# Altium PCB Briac_Charger.PcbDoc (part 1 of 4)
Units mm, origin at the board's own origin, x right, y up, seen from the top; angles counter-clockwise.
Board outline 70.05 x 79.98 mm, 2 copper layers (Top Layer, Bottom Layer), stack 1.448 mm thick; 114 components, 62 nets, 335 pads, 3733 vias.
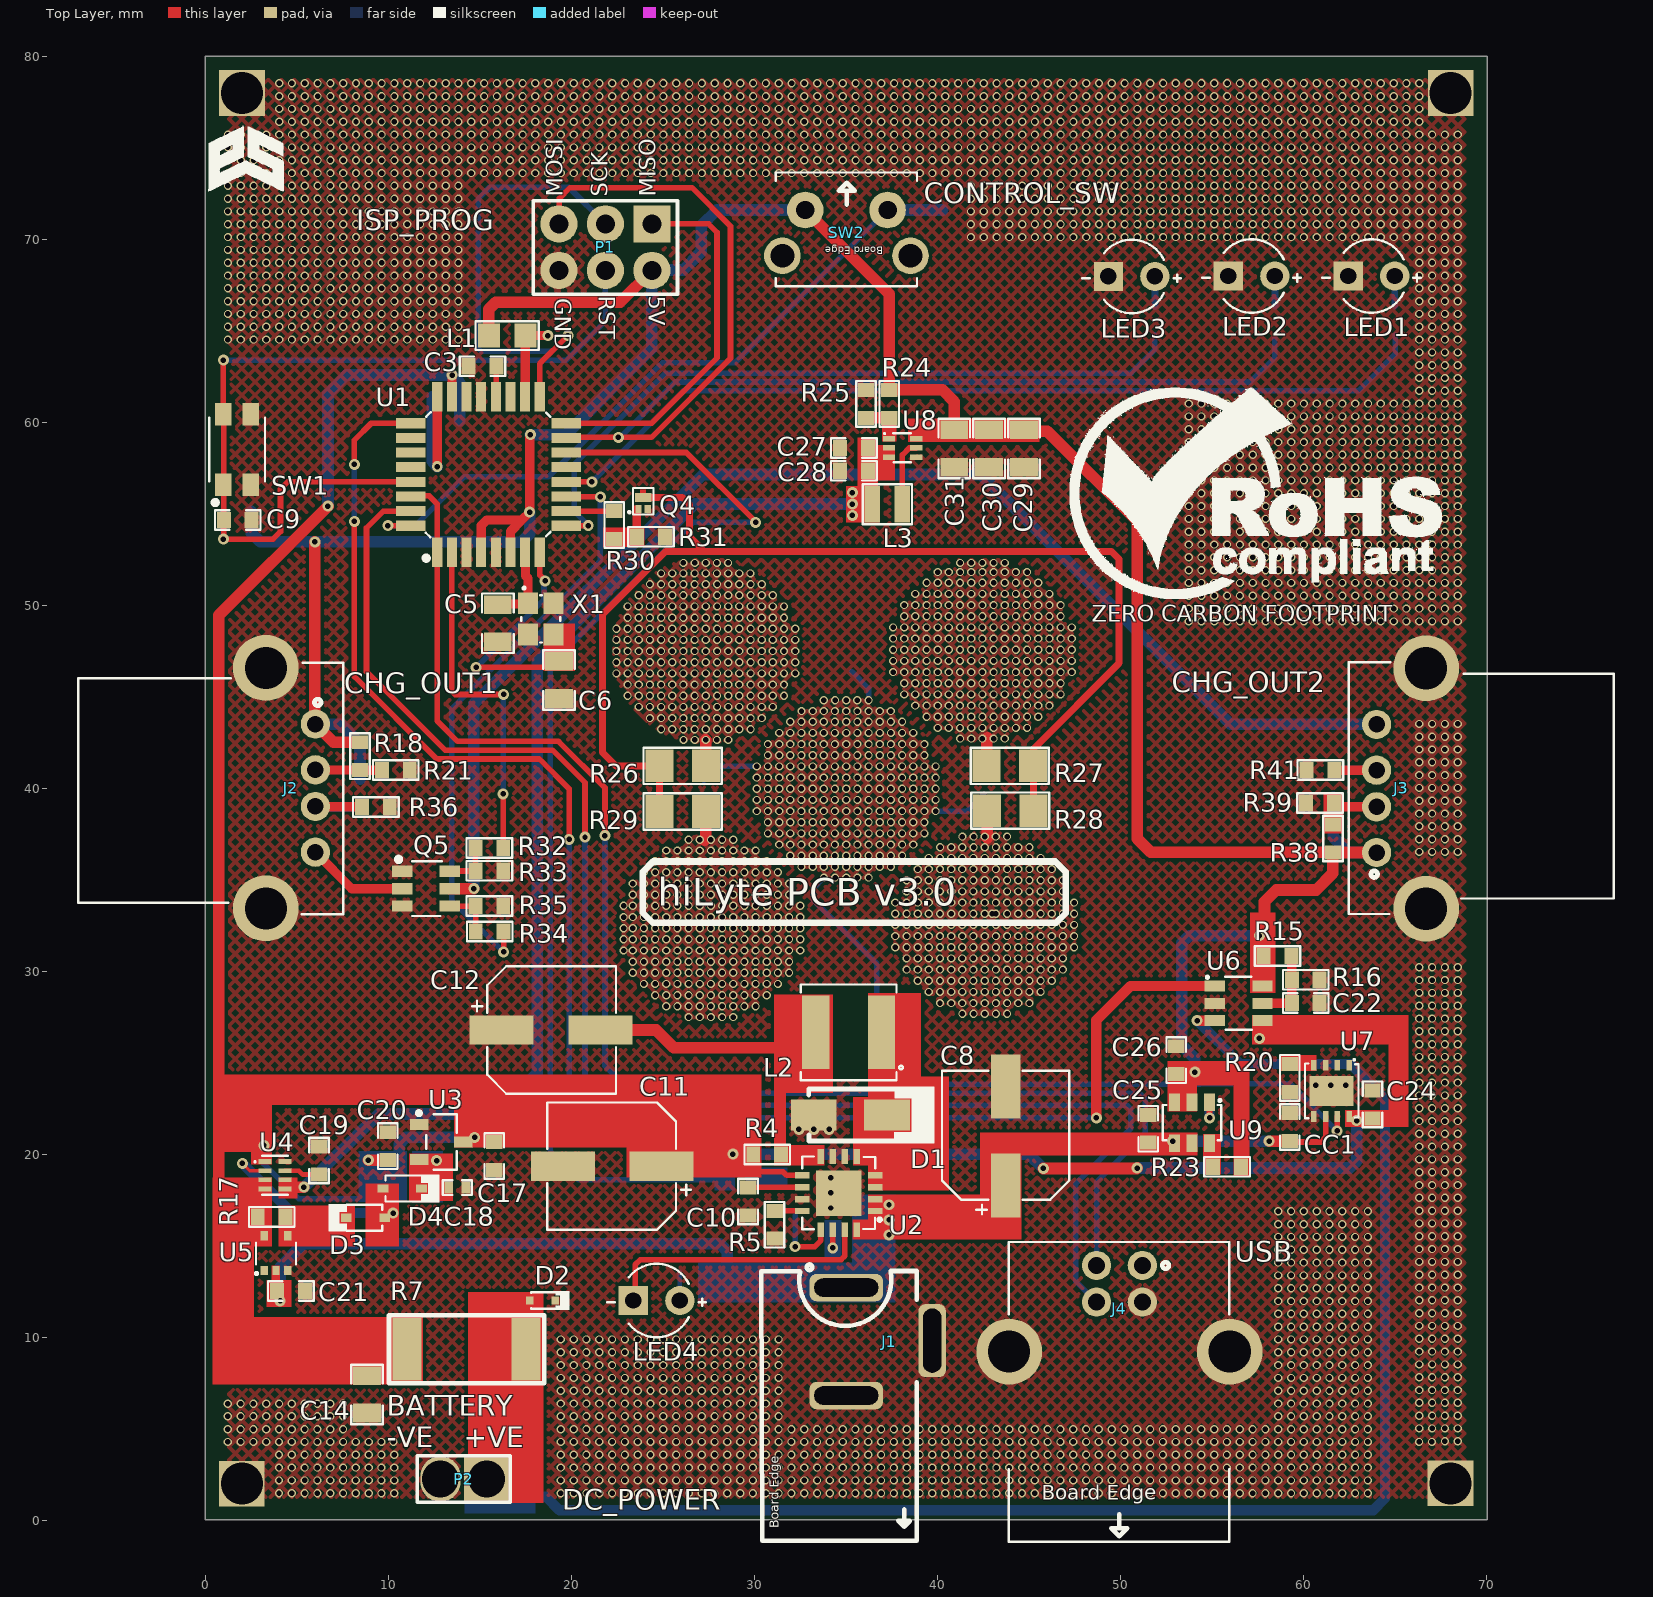
[diagram p0: Top Layer view]
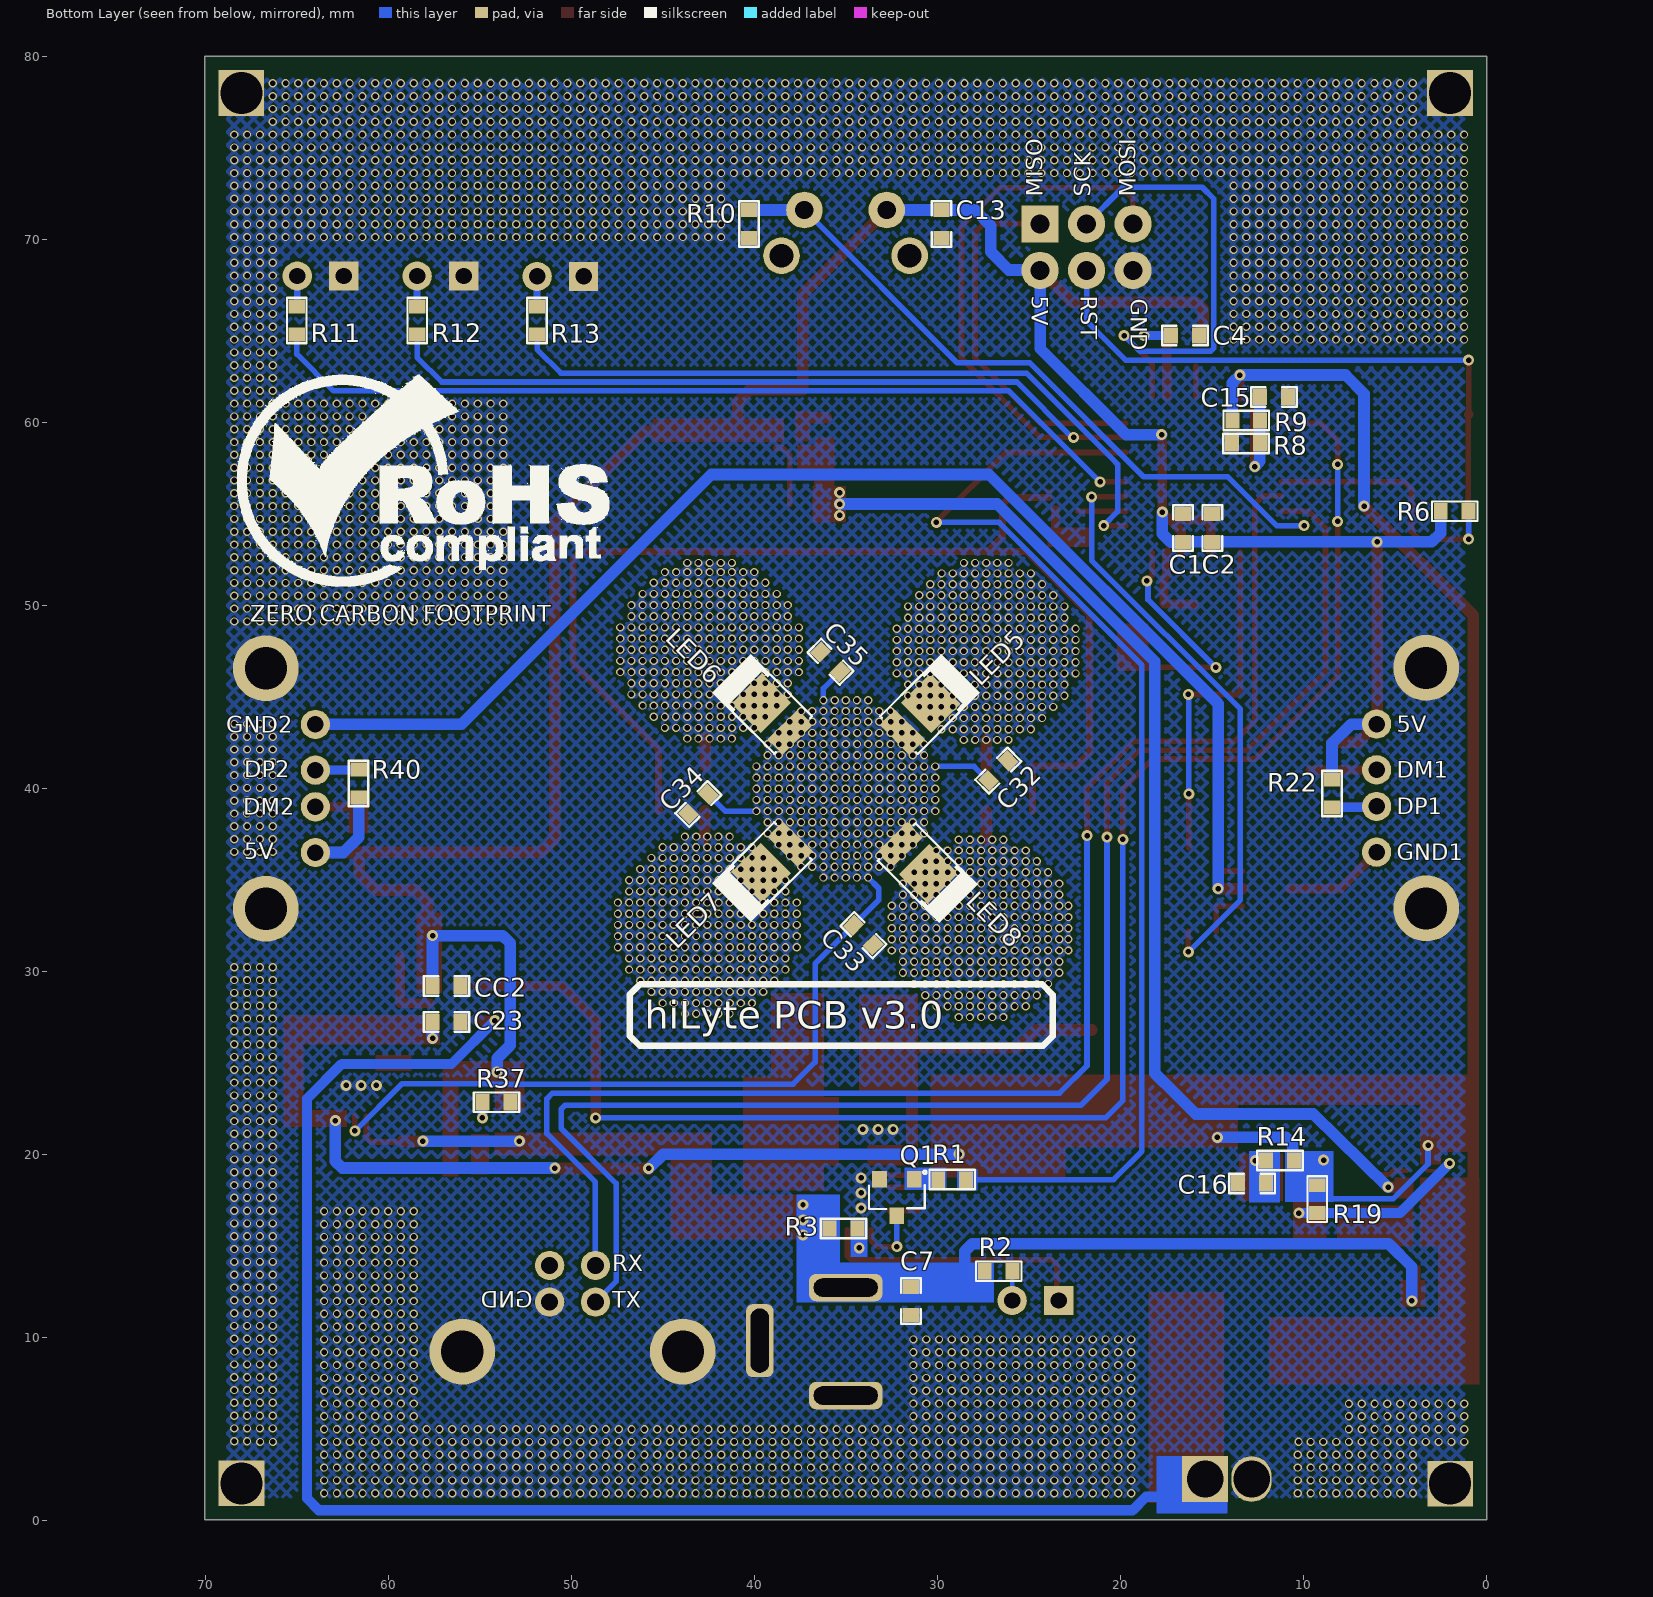
[diagram p1: Bottom Layer view, seen from below]
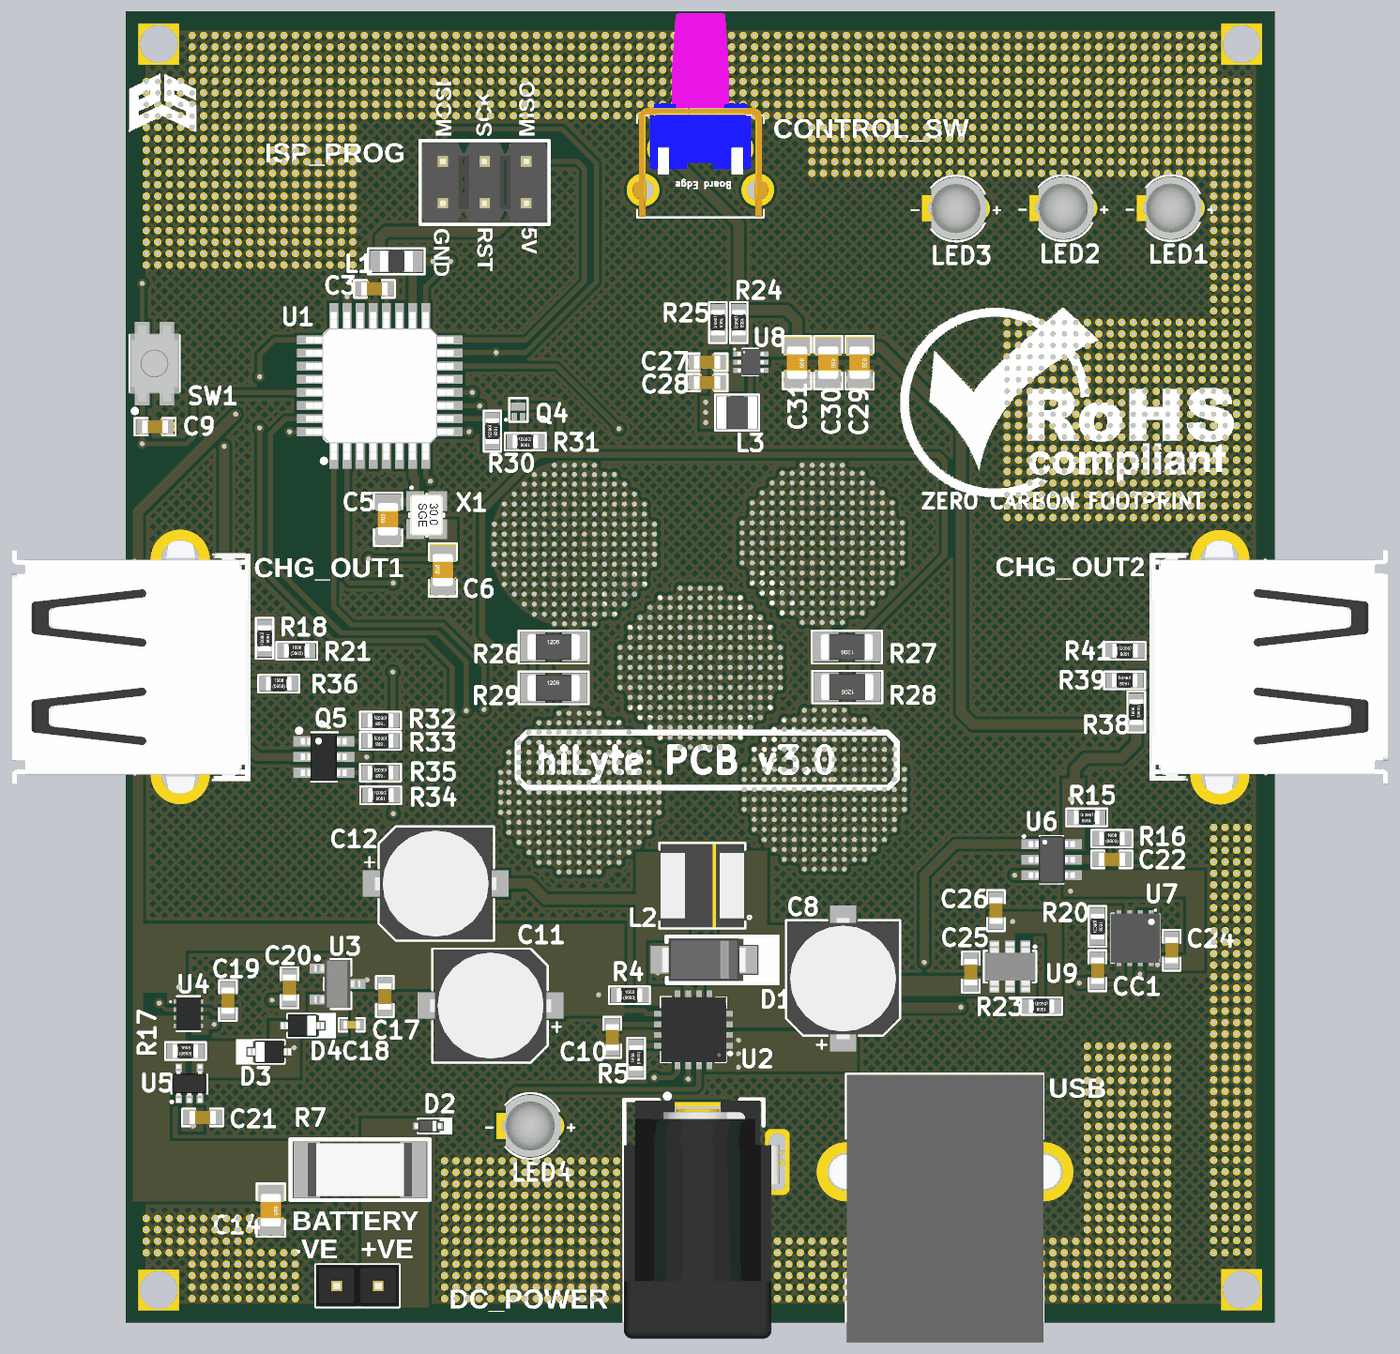
[diagram p4: 3D render of the assembled board from above, using the file's embedded part models]
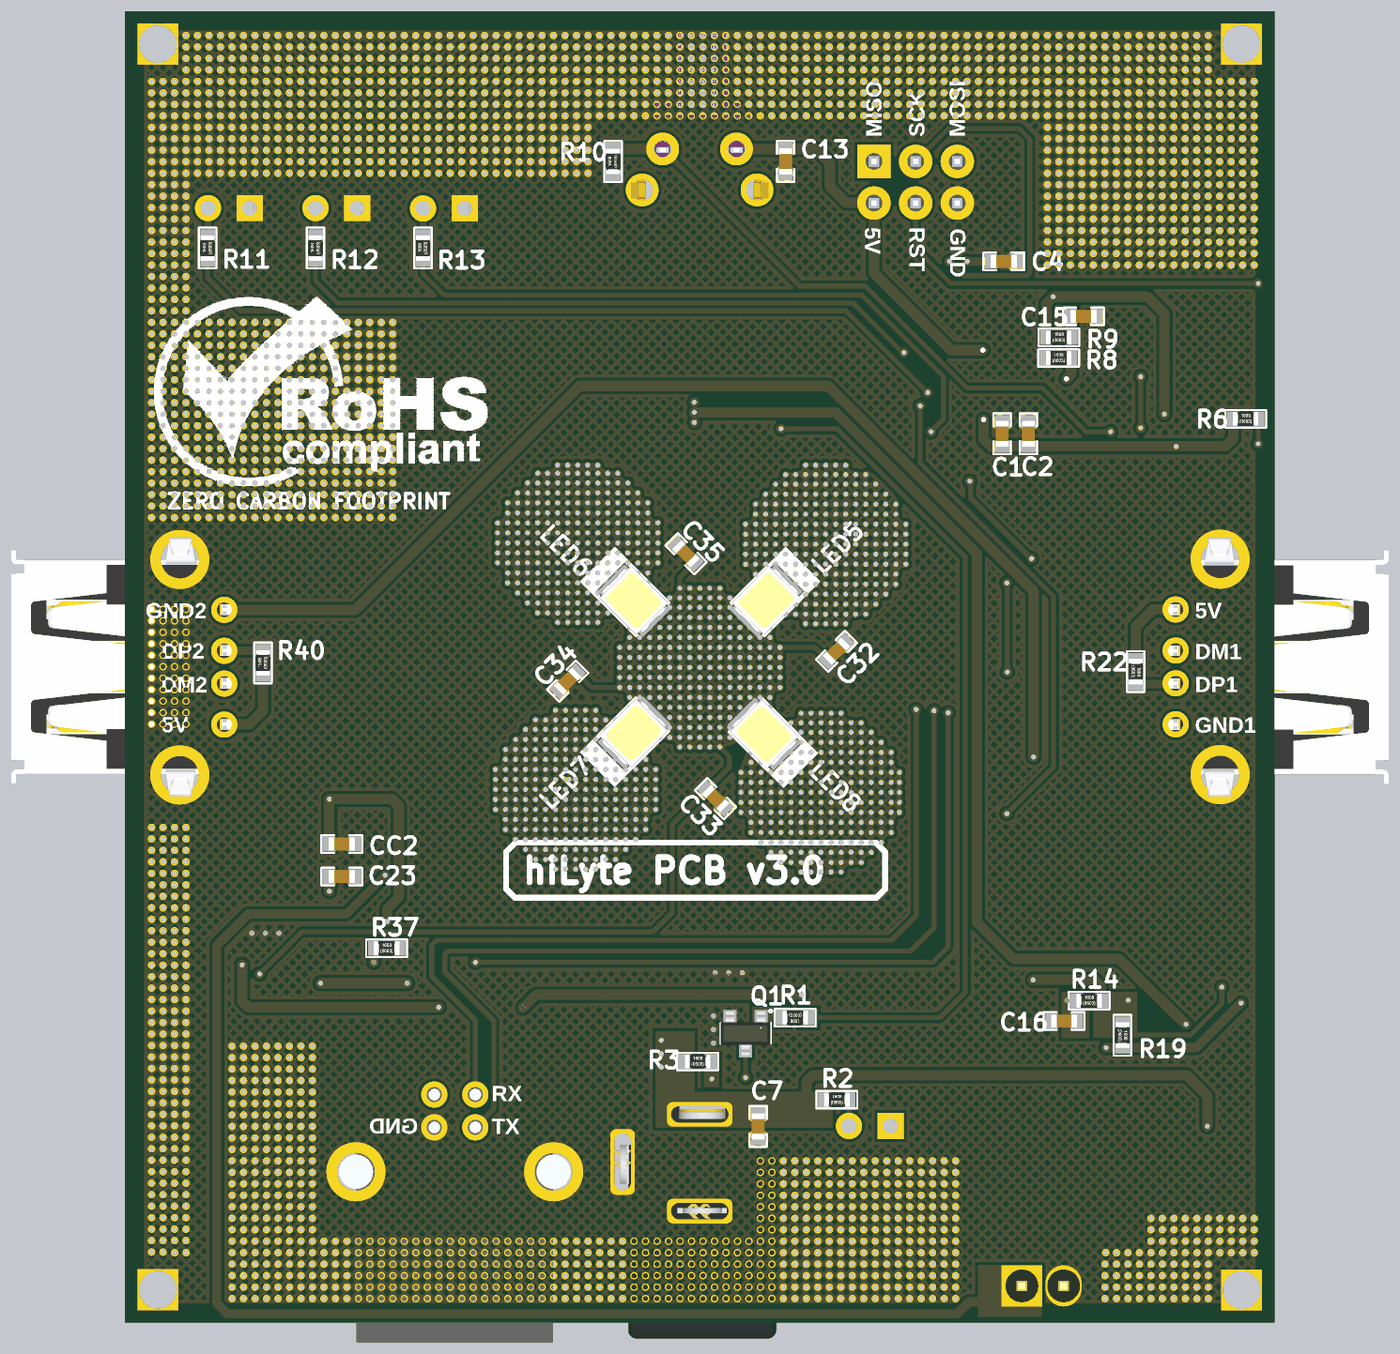
[diagram p5: 3D render of the assembled board from below, using the file's embedded part models]

## Layer stack, top to bottom
Top Solder: solder mask 0.0762, Solder Resist, Dk 3.5
Top Layer: signal copper 0.254
Dielectric 1: dielectric 0.9398, FR-4, Dk 4.8
Bottom Layer: signal copper 0.254
Bottom Solder: solder mask 0.0762, Solder Resist, Dk 3.5

## Board outline
0,0.023 0,80 70.053,80 70.053,0.023 69.698,0.023

## Design rules (kind name [scope] priority, off if disabled: settings)
Clearance [All] p1: gap=0.178 ignorepadtopadclearanceinfootprint=FALSE except(0.127: Arc-SMDPad Track-SMDPad SMDPad-SMDPad)
ComponentClearance [All] p1: gap=0 collisioncheckmode=3 verticalgap=0 showdistances=FALSE
HoleSize [All] p1: absolutevalues=TRUE maxlimit=25.4 minlimit=0.025 maxpercent=80.000 minpercent=20.000
HoleToHoleClearance [All] p1: gap=0 allowstackedmicrovias=TRUE
MinimumSolderMaskSliver [All] p1: minsoldermaskwidth=0
PolygonConnect [All] p1: connectstyle=Direct reliefconductorwidth=0.254 reliefentries=4 polygonreliefangle="90 Angle" airgapwidth=0.254
RoutingVias [All] p1: holewidth=0.3 width=0.6 viastyle="Through Hole" minholewidth=0.3 minwidth=0.4 maxholewidth=0.8 maxwidth=1.6
SilkToSilkClearance [All] p1: silktosilkclearance=0
SilkToSolderMaskClearance [IsPad] p1: minsilkscreentomaskgap=0 clearancetoexposedcopper=TRUE
SolderMaskExpansion SolderMaskExpansion_1 [IsVia] p1: expansion=0.102 istentingtop=FALSE soldermaskfromhole=TRUE
SolderMaskExpansion [Not IsVia] p2: expansion=0.102 istentingtop=FALSE
Width [All] p1: maxlimit=2.54 minlimit=0.203 preferedwidth=0.305
24 further rules are at their usual default settings.

## Classes and differential pairs
component class U_USB_Section: J2 J3 J4 Q5 R18 R21 R22 R32 R33 R34 R35 R36 R38 R39 R40 R41
component class U_Power_Section: C22 C23 C24 C25 C26 CC1 CC2 R15 R16 R20 R23 R37 U6 U7 U9
component class U_Lamp_Section: C32 C33 C34 C35 LED5 LED6 LED7 LED8 Q4 R26 R27 R28 R29 R30 R31
component class U_DCDC_Conv_Section: C27 C28 C29 C30 C31 L3 R24 R25 U8
component class U_Controller_Section: C1 C2 C3 C4 C5 C6 C9 C13 L1 LED1 LED2 LED3 R6 R10 R11 R12 R13 SW1 SW2 U1 X1
component class U_Connector_Section: C7 C14 C15 D2 J1 P2 R7 R8 R9
component class U_Battery_Management_Section: C16 C17 C18 C19 C20 C21 D3 D4 R14 R17 R19 U3 U4 U5
component class U_Battery_Charging_Section: C8 C10 C11 C12 D1 L2 LED4 Q1 R1 R2 R3 R4 R5 U2

## Components (designator, comment, footprint, x,y, rotation, side; value= is the part's Value field where it differs from the comment)
C1 "0.1uF" Cap0603#1 16.596,54.229 r90 bottom locked
C2 "0.1uF" Cap0603#1 14.996,54.229 r90 bottom locked
C3 "0.1uF" Cap0603#1 15.149,63.068 r0 top locked
C4 "0.1uF" Cap0603#1 16.495,64.744 r0 bottom locked
C5 "22uF" Cap0805 15.987,49.022 r90 top locked
C6 "22uF" Cap0805 19.329,45.923 r90 top locked
C7 "0.1uF" Cap0603#1 31.471,11.989 r270 bottom locked
C8 "10uF" UWX1H100MCL1GB 43.739,21.006 r90 top locked
C9 "0.1uF" Cap0603#1 1.778,54.661 r0 top locked
C10 "0.1uF" Cap0603#2 29.667,17.424 r90 top locked
C11 "10uF" UWX1H100MCL1GB 22.243,19.355 r180 top locked
C12 "10uF" UWX1H100MCL1GB 18.89,26.797 r0 top locked
C13 "0.1uF" Cap0603#1 29.794,70.841 r270 bottom
C14 "22uF" Cap0805 8.839,6.883 r270 top locked
C15 "0.1uF" Cap0603#1 11.633,61.392 r180 bottom
C16 "100pF" Cap0603#2 12.821,18.415 r0 bottom locked
C17 "1uF" Cap0603#2 15.793,19.914 r90 top locked
C18 "2.2nF" "Cap 0402" 13.773,18.186 r0 top locked
C19 "10uF" Cap0603#2 6.223,19.66 r270 top locked
C20 "0.1uF" Cap0603#2 9.976,20.447 r90 top locked
C21 "0.1uF" Cap0603#2 4.68,12.533 r0 top locked
C22 "0.1uF" Cap0603#2 60.135,28.27 r0 top locked
C23 "0.1uF" Cap0603#2 56.845,27.229 r180 bottom locked
C24 "0.1uF" Cap0603#2 63.779,22.733 r90 top locked
C25 "0.1uF" Cap0603#2 51.528,21.4 r90 top locked
C26 "0.1uF" Cap0603#2 53.061,25.146 r270 top locked
C27 "10uF" Cap0603#1 35.443,58.598 r180 top locked
C28 "1uF" Cap0603#1 35.443,57.353 r180 top locked
C29 "22uF" Cap0805 44.739,58.573 r270 top
C30 "22uF" Cap0805 42.834,58.573 r270 top
C31 "22uF" Cap0805 40.929,58.573 r270 top
C32 "0.1uF" Cap0603#1 26.695,40.97 r135 bottom locked
C33 "0.1uF" Cap0603#1 34.061,31.979 r225 bottom locked
C34 "0.1uF" Cap0603#1 43.078,39.141 r315 bottom locked
C35 "0.1uF" Cap0603#1 35.865,46.914 r45 bottom locked
CC1 "0.1uF" Cap0603#2 59.258,21.488 r90 top locked
CC2 "0.1uF" Cap0603#2 56.845,29.208 r180 bottom locked
D1 "SS34" SMA 35.255,22.149 r0 top value=Custom
D2 "LESD5Z5.0CT1G" LESD5Z5.0CT1G 18.426,12.014 r0 top locked value=Custom
D3 "SDM2U20SD3-7" SDM2U20SD3-7 8.757,16.535 r180 top locked
D4 "SDM2U20SD3-7" SDM2U20SD3-7 10.763,18.136 r0 top locked
J1 "DC-005-5A-2.0" DC-005-5A-2.0 35.027,6.821 r90 top locked
J2 "901-141A1011D10100" 901-141A1011D10100 6.02,41.012 r270 top locked
J3 "901-141A1011D10100" 901-141A1011D10100 64.008,38.993 r90 top locked
J4 "U241-041N-1BR85-1" U241-041N-1BR85-1 49.957,11.575 r0 top locked
L1 "10uH" Ind0805 16.495,64.744 r0 top locked
L2 "4.7uH" NR5040T4R7N 35.154,26.67 r180 top locked
L3 "1uH" 1239AS-H-1R0M=P2 37.272,55.525 r180 top locked
LED1 "L314GT" TH-LED 63.729,67.996 r0 top locked
LED2 "L314GT" TH-LED 57.175,67.996 r0 top locked
LED3 "L314GT" TH-LED 50.622,67.97 r0 top locked
LED4 "204-10SURT/S530-A3" TH-LED 24.663,12.014 r0 top locked
LED5 "2835 SMD LED" "2835 LED" 31.166,43.863 r135 bottom locked
LED6 "2835 SMD LED" "2835 LED" 38.853,43.866 r45 bottom locked
LED7 "2835 SMD LED" "2835 LED" 38.855,36.17 r315 bottom locked
LED8 "2835 SMD LED" "2835 LED" 31.293,36.119 r225 bottom locked
P1 "210-72-03GB01" HDR2X3 21.869,69.571 r180 top locked
P2 "826629-2" HDR1X2 15.392,2.261 r180 top locked
Q1 "SI2302-TP" SI2302-TP 32.233,16.637 r0 bottom locked
Q4 "DMN1045UFR4-7" DMN1045UFR4-7 23.681,55.27 r0 top
Q5 "FS8205A" SOT-23-6 12.065,34.519 r0 top locked value=Custom
R1 "1K" Res0603 29.21,18.618 r180 bottom locked
R2 "1K" Res0603 26.67,13.614 r0 bottom locked
R3 "100K" Res0603 35.154,15.951 r0 bottom locked
R4 "0.05R" Res0603 30.709,19.99 r180 top locked
R5 "0R" Res0603 31.115,16.154 r270 top locked
R6 "10K" Res0603 1.753,55.143 r0 bottom locked
R7 "0.001R" "RES 2512" 14.275,9.347 r180 top locked
R8 "12K" Res0603 13.157,58.852 r0 bottom locked
R9 "33K" Res0603 13.144,60.103 r0 bottom locked
R10 "10K" Res0603 40.31,70.841 r270 bottom
R11 "3.3K" Res0603 65.024,65.557 r270 bottom
R12 "3.3K" Res0603 58.445,65.557 r270 bottom
R13 "3.3K" Res0603 51.892,65.557 r270 bottom
R14 "470K" Res0603 11.297,19.66 r0 bottom locked
R15 "10K" Res0603 58.598,30.836 r0 top locked
R16 "10K" Res0603 60.135,29.54 r180 top locked
R17 "10K" Res0603 3.632,16.586 r180 top
R18 "47K" Res0603 8.458,41.758 r90 top
R19 "10K" Res0603 9.265,17.551 r90 bottom locked
R20 "330R" Res0603 59.258,24.181 r90 top locked
R21 "47K" Res0603 10.414,40.996 r180 top
R22 "47K" Res0603 8.458,39.726 r90 bottom
R23 "10K" Res0603 55.842,19.323 r0 top
R24 "732K" Res0603 37.373,61.011 r90 top locked
R25 "100K" Res0603 36.103,61.011 r90 top locked
R26 "100m" Res-1206 26.086,41.224 r0 top locked
R27 "100m" Res-1206 43.967,41.224 r180 top locked
R28 "100m" Res-1206 43.993,38.786 r180 top locked
R29 "100m" Res-1206 26.086,38.735 r0 top locked
R30 "1K" Res0603 22.352,54.394 r90 top
R31 "100K" Res0603 24.359,53.746 r0 top
R32 "1K" Res0603 15.524,36.744 r0 top locked
R33 "100K" Res0603 15.524,35.499 r0 top locked
R34 "1K" Res0603 15.545,32.182 r0 top locked
R35 "100K" Res0603 15.524,33.569 r0 top locked
R36 "47K" Res0603 9.322,38.989 r180 top
R37 "100K" Res0603 54.111,22.849 r0 bottom locked
R38 "47K" Res0603 61.62,37.262 r270 top
R39 "47K" Res0603 60.909,39.192 r0 top
R40 "47K" Res0603 61.646,40.259 r270 bottom locked
R41 "47K" Res0603 60.935,40.996 r0 top
SW1 "TS-1185EC-C-D-B" TS-1185EC-C-D-B 1.741,58.516 r90 top locked
SW2 "SKHHLQA010" SKHHLQA010 35.037,70.35 r180 top locked
U1 "ATMEGA328P-AU" "32 TQFP (7X7)" 15.479,57.15 r90 top locked
U2 "TP5000_QFN16" "16-QFN (4x4)" 34.62,17.882 r180 top locked
U3 "BD48K29G-TL" 3-SSOP 12.897,20.676 r270 top locked
U4 "SLG7NT402V" SLG7NT402V 3.813,18.86 r0 top locked
U5 "NC7SZ05P5X" NC7SZ05P5X 3.867,14.605 r90 top locked
U6 "INA181A3IDBVR" INA181A3IDBVR 56.464,28.255 r0 top locked
U7 "TPS2115ADRBTG4" TPS2115ADRBTG4 61.544,23.47 r270 top locked
U8 "TPS61023DRLR" TPS61023DRLR 38.11,58.598 r0 top locked
U9 "NTGD1100LT1G" NTGD1100LT1G 53.918,21.73 r270 top locked
X1 "Q24FA20H0051200" Q24FA20H0051200 18.338,49.264 r270 top locked

## Footprints (in the part's own frame and the unit in brackets; to place one, negate y for a bottom-side part, rotate by r counter-clockwise, add the part's x,y. Pads: shape width x height; smd on the part's side, far side on the other; paste and mask are expansions set on the pad)
3-SSOP [mm]
  rect 0.6x1 smd: 1(-0.95,-1.2) 2(0.95,-1.2) 3(0,1.2)
  silkscreen extent -1.67,-1.31 1.52,0.84, body extent -1.46,-1.4 1.46,1.4, height 1.23
"16-QFN (4x4)" [mm] "battery management IC 16-QFN"
  rect 0.8x0.35 smd: 1(-2,0.975) 2(-2,0.325) 3(-2,-0.325) 4(-2,-0.975) 9(2,-0.975) 10(2,-0.325) 11(2,0.325) 12(2,0.975)
  rect 0.35x0.8 smd: 5(-0.975,-2) 6(-0.325,-2) 7(0.325,-2) 8(0.975,-2) 13(0.975,2) 14(0.325,2) 15(-0.325,2) 16(-0.975,2)
  rect 2.5x2.5 smd: 17(0,0)
  silkscreen extent -2.29,-2 1.99,1.97, body extent -2,-2 2,2, height 0.92
"32 TQFP (7X7)" [mm] "IC MCU 8BIT 32KB FLASH 32TQFP"
  rect 1.6x0.55 smd: 1(-4.25,2.8) 2(-4.25,2) 3(-4.25,1.2) 4(-4.25,0.4) 5(-4.25,-0.4) 6(-4.25,-1.2) 7(-4.25,-2) 8(-4.25,-2.8) 17(4.25,-2.8) 18(4.25,-2) 19(4.25,-1.2) 20(4.25,-0.4) 21(4.25,0.4) 22(4.25,1.2) 23(4.25,2) 24(4.25,2.8)
  rect 0.55x1.6 smd: 9(-2.8,-4.25) 10(-2,-4.25) 11(-1.2,-4.25) 12(-0.4,-4.25) 13(0.4,-4.25) 14(1.2,-4.25) 15(2,-4.25) 16(2.8,-4.25) 25(2.8,4.25) 26(2,4.25) 27(1.2,4.25) 28(0.4,4.25) 29(-0.4,4.25) 30(-1.2,4.25) 31(-2,4.25) 32(-2.8,4.25)
  silkscreen extent -4.7,-3.39 3.4,3.53, body extent -4.5,-4.5 4.5,4.5, height 1.18
901-141A1011D10100 [mm] "USB - Type A 4 USB 2.0 Female"
  round 1.6 hole 0.9: 1(-2.5,0) 2(0,0) 3(2,0) 4(4.5,0)
  round 3.6 hole 2.3: MH1(-5.57,-2.71) MH2(7.57,-2.71)
  silkscreen extent -5.86,-12.95 7.9,1.52, body extent -6.88,-12.98 8.92,1.52, height 7.66
1239AS-H-1R0M=P2 [mm] "3A 1uH ±20% 59mO 1008 Inductors (SMD) ROHS"
  rect 0.85x2 smd: 1(-0.825,0) 2(0.825,0)
  silkscreen extent -1.35,-1.09 1.35,1.09, body extent -1.25,-1 1.25,1, height 1.2
"2835 LED" [mm] "1W LED SMD"
  rect 1.19x2.34 smd: 1(-1.112,0)
  rect 2.26x2.34 smd: 2(1.112,0)
  silkscreen extent -1.35,-1.5 3.43,1.5, body extent -1.47,-1.4 2.03,1.4, height 0.7
Cap0603#1 [mil]
  rect 30x35 smd mask+2.36: 1(-30,0) 2(30,0)
  silkscreen extent -49,-21 49,21, body extent -32,-16 31,16, height 34
Cap0603#2 [mil]
  rect 30x35 smd: 1(-30,0) 2(30,0)
  silkscreen extent -49,-21 49,21, body extent -32,-16 31,16, height 34
Cap0805 [mil] "SMD 0805"
  rect 40x60 smd mask+2.76: 1(-40,0) 2(40,0)
  silkscreen extent -64,-34 64,34, body extent -39,-25 39,25, height 30
"Cap 0402" [mil]
  rect 18x25 smd: 1(-18.5,0) 2(18.5,0)
  silkscreen extent -31,-16 31,16, body extent -20,-10 20,10, height 19
DC-005-5A-2.0 [mm]
  rrect50% 1.5x4 hole 1 slot 3.5 at 90 deg: 1(5.9,0) 2(0,0)
  rrect50% 4x1.5 hole 1 slot 3.5 at 0 deg: 3(3,-4.7)
  silkscreen extent -7.93,-3.86 7.16,4.64, body extent -7.77,-4.85 6.73,4.65, height 11.35
DMN1045UFR4-7 [mm]
  rect 0.33x0.445 smd: 1(0,0) 2(0.5,0)
  rect 0.9x0.505 smd: 3(0.25,0.625)
  Top Layer region: 0.076,0.864 0.406,0.864 0.406,1.064 0.076,1.064
  silkscreen extent -0.56,-0.3 0.81,1.14
HDR1X2 [mm] "CONN HEADER VERT 2POS 2.54MM"
  rect 2.5x2.5 hole 2: 1(0,0)
  oval 2.2x2.5 hole 2: 2(2.54,0)
  silkscreen extent -1.27,-1.27 3.81,1.27, body extent -1.27,-1.27 3.81,1.27, height 8.44
HDR2X3 [mm]
  rect 2.04x2.04 hole 1.02: 1(-2.54,-1.27)
  round 2.04 hole 1.02: 2(-2.54,1.27) 3(0,-1.27) 4(0,1.27) 5(2.54,-1.27) 6(2.54,1.27)
  silkscreen extent -3.94,-2.54 3.94,2.57, body extent -3.81,-2.41 3.81,2.41, height 8.59
INA181A3IDBVR [mm] "IC CURR SENSE 1 CIRCUIT SOT23-6"
  rect 1.1x0.6 smd: 1(-1.3,0.95) 2(-1.3,0) 3(-1.3,-0.95) 4(1.3,-0.95) 5(1.3,0) 6(1.3,0.95)
  silkscreen extent -1.78,-1.45 0.72,1.5, body extent -1.4,-1.45 1.4,1.45, height 1.45
Ind0805 [mm] "Inductor 0805"
  rect 1.2x1.32 smd: 1(-1,0) 2(1,0)
  silkscreen extent -1.72,-0.79 1.73,0.79, body extent -1,-0.62 1,0.63, height 0.47
LESD5Z5.0CT1G [mm]
  rect 0.42x0.42 smd: 1(0.7,0) 2(-0.7,0)
  silkscreen extent -0.61,-0.51 1.47,0.51, body extent -0.8,-0.4 0.8,0.4, height 0.7
NC7SZ05P5X [mm]
  rect 0.5x0.4 smd: 1(-0.95,0.65) 2(-0.95,0) 3(-0.95,-0.65) 4(0.95,-0.65) 5(0.95,0.65)
  silkscreen extent -1.19,-1.09 0.56,1.14, body extent -1.15,-1.05 1.15,1.05, height 0.96
NR5040T4R7N [mm]
  rect 1.5x4 smd: 1(-1.8,0) 2(1.8,0)
  silkscreen extent -2.97,-2.62 2.62,2.62, body extent -2.55,-2.55 2.55,2.56, height 4.09
NTGD1100LT1G [mm]
  rect 0.95x0.6 smd: 1(-1.125,0.95) 2(-1.125,0) 3(-1.125,-0.95) 4(1.125,-0.95) 5(1.125,0) 6(1.125,0.95)
  silkscreen extent -1.3,-1.6 0.97,1.6, body extent -1.5,-1.55 1.5,1.55, height 1.09
Q24FA20H0051200 [mm] "16MHz SMD Crystal Resonator 10pF 80O ±10ppm"
  rect 1.2x1.1 smd: 1(-0.85,-0.7) 2(0.85,-0.7) 3(0.85,0.7) 4(-0.85,0.7)
  silkscreen extent -1.75,-1.07 1.3,1.07, body extent -1.25,-1 1.25,1, height 0.55
Res0603 [mil]
  rect 30x35 smd: 1(-30,0) 2(30,0)
  silkscreen extent -49,-21 49,21, body extent -31,-17 31,17, height 18
"RES 2512" [mm]
  rect 1.6x3.4 smd: 1(-3.25,0) 2(3.25,0)
  silkscreen extent -4.24,-1.85 4.24,1.85, body extent -3.17,-1.63 3.18,1.63, height 0.58
Res-1206 [mil]
  rect 60x70 smd: 1(-50,0) 2(50,0)
  silkscreen extent -84,-39 84,39, body extent -63,-31 63,32, height 39
SDM2U20SD3-7 [mm]
  rect 0.59x0.45 smd: 1(-1.055,0) 2(1.055,0)
  silkscreen extent -0.91,-0.76 2.03,0.76, body extent -1.3,-0.68 1.3,0.67, height 1.1
SI2302-TP [mm] "MOSFET N-CH 20V 3A SOT-23"
  rect 0.8x0.9 smd: 1(-0.95,-2) 2(0.95,-2) 3(0,0)
  silkscreen extent -1.62,-2.47 1.52,-0.38, body extent -1.52,-2.34 1.52,0.31, height 1.22
SKHHLQA010 [mm]
  round 2 hole 1: 1(-2.25,-1.25) 2(2.25,-1.25)
  round 2 hole 1.3: MH1(3.5,1.25) MH2(-3.5,1.25)
  silkscreen extent -3.86,-3.3 3.86,2.92, body extent -4.25,-9.53 4.25,2.87, height 7.9
SLG7NT402V [mm]
  rect 0.7x0.26 smd: 1(-0.55,0.75) 2(-0.55,0.25) 3(-0.55,-0.25) 4(-0.55,-0.75) 5(0.55,-0.75) 6(0.55,-0.25) 7(0.55,0.25) 8(0.55,0.75)
  Top Layer region: 0.61,-0.127 0.178,-0.127 0.178,-0.889 0.61,-0.889
  Top Layer region: -0.61,-0.889 -0.178,-0.889 -0.178,-0.127 -0.61,-0.127
  silkscreen extent -1.12,-1.07 0.71,1.07, body extent -0.75,-1 0.75,1, height 0.84
SMA [mm] "DIODE GEN PURP 50V 1A SMA"
  rect 2.5x1.7 smd: 1(-2,0) 2(2,0)
  silkscreen extent -2.29,-1.55 4.6,1.55, body extent -2.6,-1.3 2.6,1.3, height 2.4
SOT-23-6 [mm] "IC BAT CHG LI-ION 1 CELL SOT23-6"
  rect 1.12x0.62 smd: 1(-1.3,0.95) 2(-1.3,0) 3(-1.3,-0.95) 4(1.3,-0.95) 5(1.3,0) 6(1.3,0.95)
  silkscreen extent -1.63,-1.5 0.86,1.73, body extent -1.4,-1.45 1.4,1.45, height 1.44
TH-LED [mm] "3.5mm (dia)"
  rect 1.6x1.6 hole 0.9: 1(-1.27,0)
  round 1.6 hole 0.9: 2(1.27,0)
  silkscreen extent -2.69,-2 2.69,2, body extent -1.52,-1.9 1.9,1.9, height 5.2
TPS2115ADRBTG4 [mm] "IC OR CTRLR SRC SELECT 8SON"
  rect 0.6x0.3 smd: 1(-1.4,0.975) 2(-1.4,0.325) 3(-1.4,-0.325) 4(-1.4,-0.975) 5(1.4,-0.975) 6(1.4,-0.325) 7(1.4,0.325) 8(1.4,0.975)
  rect 1.65x2.4 smd: 9(0,0)
  silkscreen extent -1.74,-1.45 1.49,1.47, body extent -1.5,-1.5 1.5,1.5, height 1
TPS61023DRLR [mm] "Boost Switching Regulator IC 2.2V 1 Output 3A SOT-563, SOT-666"
  rect 0.67x0.3 smd: 1(-0.74,0.5) 2(-0.74,0) 3(-0.74,-0.5) 4(0.74,-0.5) 5(0.74,0) 6(0.74,0.5)
  silkscreen extent -1.02,-0.79 0.45,0.81, body extent -0.8,-0.8 0.8,0.8, height 0.6
TS-1185EC-C-D-B [mm]
  rect 1.25x0.9 smd: 1(-1.925,0.75) 1(1.925,0.75) 2(-1.925,-0.75) 2(1.925,-0.75)
  silkscreen extent -3.02,-1.52 1.73,1.52, body extent -2.33,-1.5 2.32,1.5, height 2
U241-041N-1BR85-1 [mm] "USB - Type B 4 USB 2.0 Female Through Hole"
  round 1.6 hole 0.92: 1(1.25,2.355) 2(-1.25,2.355) 3(-1.25,0.355) 4(1.25,0.355)
  round 3.6 hole 2.3: MH1(-6.025,-2.355) MH2(6.025,-2.355)
  silkscreen extent -6.05,-12.75 6,3.63, body extent -7.07,-12.75 7.08,3.55, height 11.2
UWX1H100MCL1GB [mm]
  rect 3.5x1.6 smd: 1(-2.7,0) 2(2.7,0)
  silkscreen extent -4.29,-3.48 3.56,3.48, body extent -3.7,-3.4 3.7,3.4, height 5.57

## Part data
C1 C2 C3 C4 C7 C9 C10 C13 C15 C20 C21 C22 C23 C24 C25 C26 C32 C33 C34 C35 CC1 CC2: library part CC0603ZRY5V9BB104, "CAP CER 0.1UF 50V Y5V 0603", Capacitance=100nF, Case Code (Imperial)=0603, Case Code (Metric)=1608, Dielectric=Y5V, MANUFACTURER=Yageo, Max Operating Temperature=85°C, Min Operating Temperature=-30°C, Package Quantity=1, Supplier Part Number 1=311-1343-1-ND, Tolerance=80%, Voltage=50V, Case/Package=0603, ComponentLink1Description=http://www.yageo.com/documents/recent/UPY-GPHC_Y5V_6.3V-to-50V_8.pdf?src-supplier=Digi-Key, ComponentLink1URL=http://www.yageo.com/documents/recent/UPY-GPHC_Y5V_6.3V-to-50V_8.pdf?src-supplier=Digi-Key, ComponentLink2Description=http://www.yageo.com/documents/recent/UPY-GPHC_Y5V_6.3V-to-50V_5.pdf?src-supplier=Avnet+Europe, ComponentLink2URL=http://www.yageo.com/documents/recent/UPY-GPHC_Y5V_6.3V-to-50V_5.pdf?src-supplier=Avnet+Europe, ComponentLink3Description=https://www.verical.com/server-webapp/html/getDatasheet?partID=403611&src-supplier=Verical, ComponentLink3URL=https://www.verical.com/server-webapp/html/getDatasheet?partID=403611&src-supplier=Verical, ComponentLink4Description=http://www.mouser.com/ds/2/447/Yageo_UPY-GP_NP0_16V-to-50V_9-358835.pdf?src-supplier=Mouser, ComponentLink4URL=http://www.mouser.com/ds/2/447/Yageo_UPY-GP_NP0_16V-to-50V_9-358835.pdf?src-supplier=Mouser, ComponentLink5Description=http://www.farnell.com/datasheets/1132289.pdf?src-supplier=Element14, ComponentLink5URL=http://www.farnell.com/datasheets/1132289.pdf?src-supplier=Element14, Composition=Ceramic, Depth=0.8mm, Halogen Free="Halogen Free", Height=0.8mm, Lead Free="Lead Free", Length=1.6mm, Manufacturer Part Number=CC0603ZRY5V9BB104, Mount="Surface Mount", Number of Pins=2, Packaging="Tape and Reel", Pricing 1="1=0.1, 10=0.075, 100=0.0334, 500=0.02386, 1000=0.01874 (USD)", Radiation Hardening=No, REACH SVHC="No SVHC", Stock 1=15000880, Supplier 1=Digi-Key, Termination=SMD/SMT, Thickness=0.035inch, Voltage Rating=50V, Voltage Rating (DC)=50V, Width=0.031inch
C5 C6 C14 C29 C30 C31: library part C2012X5R1V226MT000E, "CAP CER 22UF 35V X5R 0805"
C8 C11 C12: library part UWX1H100MCL1GB, "CAP ALUM 10UF 20% 50V SMD", MANUFACTURER=Nichicon, Package="0.260\" L x 0.260\" W (6.60mm x 6.60mm)", ComponentLink1Description="New link", ComponentLink1URL=https://www.digikey.co.uk/en/products/detail/nichicon/UWX1H100MCL1GB/589876?s=N4IgTCBcDaIKoHUAaBGAEigDJgsgYQBkUBxAIRAF0BfIA, Manufacturer Part No=UWX1H100MCL1GB
C16: library part CC0603JRNPO8BN101, "CAP CER 100PF 25V C0G/NPO 0603", Case/Package=0603, Dielectric=C0G, MANUFACTURER=Yageo, Max Operating Temperature=125°C, Min Operating Temperature=-55°C, Resistor Type=Ceramic, Supplier Part Number 1=311-3949-1-ND, Tolerance=5%, Voltage Rating=25V, Capacitance=100pF, ComponentLink1Description=http://www.yageo.com/documents/recent/UPY-GPHC_Y5V_6.3V-to-50V_8.pdf?src-supplier=Digi-Key, ComponentLink1URL=http://www.yageo.com/documents/recent/UPY-GPHC_Y5V_6.3V-to-50V_8.pdf?src-supplier=Digi-Key, ComponentLink2Description=http://www.yageo.com/documents/recent/UPY-GPHC_Y5V_6.3V-to-50V_5.pdf?src-supplier=Avnet+Europe, ComponentLink2URL=http://www.yageo.com/documents/recent/UPY-GPHC_Y5V_6.3V-to-50V_5.pdf?src-supplier=Avnet+Europe, ComponentLink3Description=https://www.verical.com/server-webapp/html/getDatasheet?partID=403611&src-supplier=Verical, ComponentLink3URL=https://www.verical.com/server-webapp/html/getDatasheet?partID=403611&src-supplier=Verical, ComponentLink4Description=http://www.mouser.com/ds/2/447/Yageo_UPY-GP_NP0_16V-to-50V_9-358835.pdf?src-supplier=Mouser, ComponentLink4URL=http://www.mouser.com/ds/2/447/Yageo_UPY-GP_NP0_16V-to-50V_9-358835.pdf?src-supplier=Mouser, ComponentLink5Description=http://www.farnell.com/datasheets/1132289.pdf?src-supplier=Element14, ComponentLink5URL=http://www.farnell.com/datasheets/1132289.pdf?src-supplier=Element14, ComponentLink6Description=http://www.yageo.com/documents/recent/UPY-GP_NP0_16V-to-50V_8.pdf?src-supplier=Avnet, ComponentLink6URL=http://www.yageo.com/documents/recent/UPY-GP_NP0_16V-to-50V_8.pdf?src-supplier=Avnet, ComponentLink7Description=http://www.yageo.com/documents/recent/UPY-GP_NP0_16V-to-50V_8.pdf?src-supplier=Avnet+Europe, ComponentLink7URL=http://www.yageo.com/documents/recent/UPY-GP_NP0_16V-to-50V_8.pdf?src-supplier=Avnet+Europe, Construction=Flat, Depth=0.8mm, Height=0.8mm, Length=0.063inch, Manufacturer Part Number=CC0603JRNPO8BN101, Mount="Surface Mount", Packaging="Tape and Reel", Pricing 1="1=0.1, 10=0.058, 50=0.0318, 100=0.026, 500=0.0186, 1000=0.0146 (USD)", Radiation Hardening=No, RoHS Compliant=Yes, Series=CC, Stock 1=19776, Supplier 1=Digi-Key, Thickness=0.035inch, Voltage Rating (DC)=25V, Width=0.031inch
C17 C28: library part CC0603ZRY5V8BB105, "CAP CER 1UF 25V Y5V 0603", Case Code (Imperial)=0603, Case Code (Metric)=1608, Dielectric=Y5V, MANUFACTURER=Yageo, Max Operating Temperature=85°C, Min Operating Temperature=-30°C, Resistor Type=Ceramic, Supplier Part Number 1=311-1829-1-ND, Tolerance=80%, Voltage Rating=25V, Capacitance=1uF, Case/Package=0603, ComponentLink1Description=http://www.yageo.com/documents/recent/UPY-GPHC_Y5V_6.3V-to-50V_8.pdf?src-supplier=Digi-Key, ComponentLink1URL=http://www.yageo.com/documents/recent/UPY-GPHC_Y5V_6.3V-to-50V_8.pdf?src-supplier=Digi-Key, ComponentLink2Description=http://www.yageo.com/documents/recent/UPY-GPHC_Y5V_6.3V-to-50V_5.pdf?src-supplier=Avnet+Europe, ComponentLink2URL=http://www.yageo.com/documents/recent/UPY-GPHC_Y5V_6.3V-to-50V_5.pdf?src-supplier=Avnet+Europe, ComponentLink3Description=https://www.verical.com/server-webapp/html/getDatasheet?partID=403611&src-supplier=Verical, ComponentLink3URL=https://www.verical.com/server-webapp/html/getDatasheet?partID=403611&src-supplier=Verical, ComponentLink4Description=http://www.mouser.com/ds/2/447/Yageo_UPY-GP_NP0_16V-to-50V_9-358835.pdf?src-supplier=Mouser, ComponentLink4URL=http://www.mouser.com/ds/2/447/Yageo_UPY-GP_NP0_16V-to-50V_9-358835.pdf?src-supplier=Mouser, ComponentLink5Description=http://www.farnell.com/datasheets/1132289.pdf?src-supplier=Element14, ComponentLink5URL=http://www.farnell.com/datasheets/1132289.pdf?src-supplier=Element14, Halogen Free="Halogen Free", Height=0.8mm, Lead Free="Lead Free", Length=0.063inch, Manufacturer Part Number=CC0603ZRY5V8BB105, Mount="Surface Mount", Packaging="Tape and Reel", Pricing 1="1=0.13, 10=0.096, 50=0.0544, 100=0.045, 500=0.0316, 1000=0.0261 (USD)", RoHS Compliant=Yes, Series=CC, Stock 1=82432, Supplier 1=Digi-Key, Termination=SMD/SMT, Thickness=0.035inch, Voltage Rating (DC)=25V, Width=0.031inch
C18: library part C0402C222J3GEC7867, "CAP CER 0402 2.2NF 25V C0G 5%", MANUFACTURER=KEMET, Supplier Part Number 1=399-C0402C222J3GEC7867CT-ND, ComponentLink1Description=http://www.yageo.com/documents/recent/UPY-GPHC_Y5V_6.3V-to-50V_8.pdf?src-supplier=Digi-Key, ComponentLink1URL=http://www.yageo.com/documents/recent/UPY-GPHC_Y5V_6.3V-to-50V_8.pdf?src-supplier=Digi-Key, ComponentLink2Description=http://www.yageo.com/documents/recent/UPY-GPHC_Y5V_6.3V-to-50V_5.pdf?src-supplier=Avnet+Europe, ComponentLink2URL=http://www.yageo.com/documents/recent/UPY-GPHC_Y5V_6.3V-to-50V_5.pdf?src-supplier=Avnet+Europe, ComponentLink3Description=https://www.verical.com/server-webapp/html/getDatasheet?partID=403611&src-supplier=Verical, ComponentLink3URL=https://www.verical.com/server-webapp/html/getDatasheet?partID=403611&src-supplier=Verical, ComponentLink4Description=http://www.mouser.com/ds/2/447/Yageo_UPY-GP_NP0_16V-to-50V_9-358835.pdf?src-supplier=Mouser, ComponentLink4URL=http://www.mouser.com/ds/2/447/Yageo_UPY-GP_NP0_16V-to-50V_9-358835.pdf?src-supplier=Mouser, ComponentLink5Description=http://www.farnell.com/datasheets/1132289.pdf?src-supplier=Element14, ComponentLink5URL=http://www.farnell.com/datasheets/1132289.pdf?src-supplier=Element14, ComponentLink6Description=http://www.yageo.com/documents/recent/UPY-GP_NP0_16V-to-50V_8.pdf?src-supplier=Avnet, ComponentLink6URL=http://www.yageo.com/documents/recent/UPY-GP_NP0_16V-to-50V_8.pdf?src-supplier=Avnet, ComponentLink7Description=http://www.yageo.com/documents/recent/UPY-GP_NP0_16V-to-50V_8.pdf?src-supplier=Avnet+Europe, ComponentLink7URL=http://www.yageo.com/documents/recent/UPY-GP_NP0_16V-to-50V_8.pdf?src-supplier=Avnet+Europe, ComponentLink8Description=https://api.kemet.com/component-edge/download/datasheet/C0402C222J3GEC7867.pdf?src-supplier=Digi-Key, ComponentLink8URL=https://api.kemet.com/component-edge/download/datasheet/C0402C222J3GEC7867.pdf?src-supplier=Digi-Key, Manufacturer Part Number=C0402C222J3GEC7867, Pricing 1="1=0.17, 10=0.123, 50=0.07, 100=0.058, 500=0.0407, 1000=0.0337, 2500=0.0314, 5000=0.0287 (USD)", Stock 1=5024, Supplier 1=Digi-Key
C19 C27: library part CC0603MRX5R8BB106, "CAP CER 10UF 25V X5R 0603", Case Code (Imperial)=0603, Case Code (Metric)=1608, MANUFACTURER=Yageo, Max Operating Temperature=85°C, Min Operating Temperature=-55°C, Supplier Part Number 1=311-3494-6-ND, Tolerance=20%, Voltage Rating=25V, Capacitance=10uF, Case/Package=0603, ComponentLink1Description=http://www.yageo.com/documents/recent/UPY-GPHC_Y5V_6.3V-to-50V_8.pdf?src-supplier=Digi-Key, ComponentLink1URL=http://www.yageo.com/documents/recent/UPY-GPHC_Y5V_6.3V-to-50V_8.pdf?src-supplier=Digi-Key, ComponentLink2Description=http://www.yageo.com/documents/recent/UPY-GPHC_Y5V_6.3V-to-50V_5.pdf?src-supplier=Avnet+Europe, ComponentLink2URL=http://www.yageo.com/documents/recent/UPY-GPHC_Y5V_6.3V-to-50V_5.pdf?src-supplier=Avnet+Europe, ComponentLink3Description=https://www.verical.com/server-webapp/html/getDatasheet?partID=403611&src-supplier=Verical, ComponentLink3URL=https://www.verical.com/server-webapp/html/getDatasheet?partID=403611&src-supplier=Verical, ComponentLink4Description=http://www.mouser.com/ds/2/447/Yageo_UPY-GP_NP0_16V-to-50V_9-358835.pdf?src-supplier=Mouser, ComponentLink4URL=http://www.mouser.com/ds/2/447/Yageo_UPY-GP_NP0_16V-to-50V_9-358835.pdf?src-supplier=Mouser, ComponentLink5Description=http://www.farnell.com/datasheets/1132289.pdf?src-supplier=Element14, ComponentLink5URL=http://www.farnell.com/datasheets/1132289.pdf?src-supplier=Element14, ComponentLink6Description=https://www.yageo.com/upload/media/product/productsearch/datasheet/mlcc/UPY-GPHC_X5R_4V-to-50V_26.pdf?src-supplier=Digi-Key, ComponentLink6URL=https://www.yageo.com/upload/media/product/productsearch/datasheet/mlcc/UPY-GPHC_X5R_4V-to-50V_26.pdf?src-supplier=Digi-Key, Manufacturer Part Number=CC0603MRX5R8BB106, Mount="Surface Mount", Packaging="Cut Tape", Pricing 1="1=0.77, 10=0.568, 50=0.4542, 100=0.3893, 500=0.3082, 1000=0.2595 (USD)", RoHS Compliant=Yes, Stock 1=0, Supplier 1=Digi-Key
D1: "40V 550mV 3A 3A SMA(DO-214AC) Schottky Barrier Diodes (SBD)", MANUFACTURER=Changzhou, Package=SMA(DO-214AC), ComponentLink1Description=LCSC, ComponentLink1URL=https://lcsc.com/product-detail/Schottky-Barrier-Diodes-SBD_Changzhou-Starsea-Elec-SS34_C83961.html, Manufacturer Part No=SS34
D2: "SOD-523 ESD Protection Devices ROHS", MANUFACTURER=UMW, Package=SOD-523, ComponentLink1Description=LCSC, ComponentLink1URL=https://lcsc.com/product-detail/span-style-background-color-ff0-ESD-span-Protection-Devices_UMW-Youtai-Semiconductor-Co-Ltd-LESD5Z5-0CT1G_C2833276.html, Manufacturer Part No=LESD5Z5.0CT1G
D3 D4: "DIODE SCHOTTKY 20V 2A SOD323", Average Rectified Current=2A, MANUFACTURER=Diodes, Max Reverse Voltage (DC)=20V, Supplier Part Number 1=SDM2U20SD3-7DICT-ND, Category="Rectifier Diodes", ComponentLink1Description=http://www.mouser.com/ds/2/115/SDM2U20SD3-537776.pdf?src-supplier=Mouser, ComponentLink1URL=http://www.mouser.com/ds/2/115/SDM2U20SD3-537776.pdf?src-supplier=Mouser, ComponentLink2Description=https://www.diodes.com/assets/Datasheets/SDM2U20SD3.pdf?src-supplier=Digi-Key, ComponentLink2URL=https://www.diodes.com/assets/Datasheets/SDM2U20SD3.pdf?src-supplier=Digi-Key, ComponentLink3Description=http://diodes.com/datasheets/SDM2U20SD3.pdf?src-supplier=Avnet, ComponentLink3URL=http://diodes.com/datasheets/SDM2U20SD3.pdf?src-supplier=Avnet, Manufacturer Part Number=SDM2U20SD3-7, Mount="Surface Mount", Packaging="Cut Tape", Pricing 1="1=0.47000, 10=0.35200, 100=0.19930, 500=0.13200, 1000=0.10120 (USD)", RoHS=Yes, RoHS Compliant=Yes, Stock 1=6, Supplier 1=Digi-Key
J1: "DC Power Receptacle 2mm 6.2mm 5A 24V Plugin AC/DC Power Connectors ROHS", MANUFACTURER="XKB Connectivity", Package=Custom, ComponentLink1Description="New link", ComponentLink1URL=https://datasheet.lcsc.com/lcsc/2110151630_XKB-Connectivity-DC-005-5A-2-0_C381116.pdf, Manufacutrer Part No=DC-005-5A-2.0
J2 J3: "USB - Type A 4 USB 2.0 Female THT", Current Rating=1.5A, MANUFACTURER="Jing Extension of the Electronic Co.", Connector Type="USB - Type A", Gender=Female, Mounting Type=ThroughHole,RightAngle, Number of Contacts=4, Number of Ports=1, Standard="USB 2.0"
J4: "USB - Type B 4 USB 2.0 Female Through Hole", Current Rating=2A, MANUFACTURER="XKB Connectivity", Connector Type="USB - Type B", Gender=Female, Mounting Type=ThroughHole,RightAngle, Number of Contacts=4, Number of Ports=1, Standard="USB 2.0"
L1: library part MGFL2012F100MT-LF, "500mA 10uH ±20% 320mO 0805 Inductors", MANUFACTURER=Microgate, Package=0805, ComponentLink1Description="New link", ComponentLink1URL=https://lcsc.com/product-detail/Inductors-SMD_microgate-MGFL2012F100MT-LF_C281113.html, Manufacturer Part No=MGFL2012F100MT-LF
L2: library part NR5040T4R7N, "Inductor Power Shielded Wirewound 4.7uH 30% 100KHz Ferrite 3.1A 0.0377Ohm DCR T/R", Case/Package=Nonstandard, Current Rating=3.1A, DC Resistance (DCR)=37.7mR, Inductance Tolerance=30%, MANUFACTURER="Taiyo Yuden", Max DC Current=3.3A, Max Operating Temperature=120°C, Min Operating Temperature=-25°C, Package Quantity=1500, Resistor Type=Wirewound, Self Resonant Frequency=28MHz, Supplier Part Number 1=587-2373-1-ND, Test Frequency=100kHz, Category="Fixed Inductors", ComponentLink1Description=https://datasheet.ciiva.com/8502/nr5040t4r7n-ss-8502907.pdf?src-supplier=Avnet, ComponentLink1URL=https://datasheet.ciiva.com/8502/nr5040t4r7n-ss-8502907.pdf?src-supplier=Avnet, ComponentLink2Description=https://datasheet.ciiva.com/1044/wound04-e-1044092.pdf?src-supplier=Digi-Key, ComponentLink2URL=https://datasheet.ciiva.com/1044/wound04-e-1044092.pdf?src-supplier=Digi-Key, ComponentLink3Description=https://datasheet.ciiva.com/1044/wound04-e-1044093.pdf?src-supplier=Digi-Key, ComponentLink3URL=https://datasheet.ciiva.com/1044/wound04-e-1044093.pdf?src-supplier=Digi-Key, ComponentLink4Description=https://datasheet.ciiva.com/4960/wound04-e-4960327.pdf?src-supplier=Mouser, ComponentLink4URL=https://datasheet.ciiva.com/4960/wound04-e-4960327.pdf?src-supplier=Mouser, ComponentLink5Description=https://datasheet.ciiva.com/1044/wound04-e-1044091.pdf?src-supplier=Digi-Key, ComponentLink5URL=https://datasheet.ciiva.com/1044/wound04-e-1044091.pdf?src-supplier=Digi-Key, Core Material=Ferrite, Depth=5.1mm, Halogen Free="Halogen Free", Height=4mm, Height - Seated (Max)=0.161inch, Inductance=4.7uH, Length=0.193inch, Manufacturer Part Number=NR5040T4R7N, Mount="Surface Mount", Number of Pins=2, Packaging="Tape and Reel", Pricing 1="1=0.48000, 10=0.42700, 25=0.37360, 50=0.32000, 100=0.29340, 250=0.26676, 500=0.25074 (USD)", Radiation Hardening=No, REACH SVHC=Unknown, RMS Current (Irms)=3.1A, RoHS=Yes, RoHS Compliant=Yes, Saturation Current=3.3A, Series=NR, Shielding=Shielded, Stock 1=62864, Supplier 1=Digi-Key, Termination=SMD/SMT, Tolerance=30%, Width=4.9mm
L3: library part 1239AS-H-1R0M=P2, "3A 1uH ±20% 59mO 1008 Inductors (SMD) ROHS"
LED1 LED2 LED3: "Green - LED Indication - Discrete 2.1V Radial", MANUFACTURER="American Opto Plus LED", Package=Custom, ComponentLink1Description="New link", ComponentLink1URL=https://www.digikey.com/en/products/detail/american-opto-plus-led/L314GT/13165175, Manufacturer Part No=L314GT
LED4: "Red 624nm Through Hole Light Emitting Diodes (LED) ROHS", MANUFACTURER="Everlight Elec", Manufacturer Part No=204-10SURT/S530-A3
LED5 LED6 LED7 LED8: "SMD LED 2835 Chips 1W 3V SMD", MANUFACTURER=ENLINCA, Max. Forward voltage=3V, Package=2835
P1: "Straight Square Pins 2.5mm 6.1mm -40?~+105? 2 3mm 6 2.54mm Black Brass 2x3P 2.54mm Plugin,P=2.54mm Pin Headers ROHS", MANUFACTURER=PINREX, Package=Custom, ComponentLink1Description="New link", ComponentLink1URL=https://lcsc.com/product-detail/Pin-Headers_PINREX-210-72-03GB01_C402781.html, Manufacturer Part No=210-72-03GB01
P2: "CONN HEADER VERT 2POS 2.54MM", Color=Green, Current Rating=3A, Flammability Rating="UL94 V-0", High Temperature Housing=No, MANUFACTURER="TE Connectivity", Manufacturer Part Number=8266292, Max Operating Temperature=105°C, Min Operating Temperature=-65°C, Package Quantity=3000, Supplier Part Number 1=1361864, Board Standoff="No (Without)", Category="Board to Board Connectors", ComponentLink1Description=https://datasheet.ciiva.com/11746/0900766b80d7c358-11746248.pdf?src-supplier=RSComponents, ComponentLink1URL=https://datasheet.ciiva.com/11746/0900766b80d7c358-11746248.pdf?src-supplier=RSComponents, ComponentLink2Description=https://datasheet.ciiva.com/30224/8266292-30224019.pdf?src-supplier=Onlinecomponents.com, ComponentLink2URL=https://datasheet.ciiva.com/30224/8266292-30224019.pdf?src-supplier=Onlinecomponents.com, ComponentLink3Description=https://datasheet.ciiva.com/29369/001094754-da-01-en-stiftleiste-1-reihig-0-0826629-2-29369600.pdf?src-supplier=Conrad, ComponentLink3URL=https://datasheet.ciiva.com/29369/001094754-da-01-en-stiftleiste-1-reihig-0-0826629-2-29369600.pdf?src-supplier=Conrad, ComponentLink4Description=https://datasheet.ciiva.com/6857/eng-cd-826629-aa-basefilename-6857135.pdf?src-supplier=Digi-Key, ComponentLink4URL=https://datasheet.ciiva.com/6857/eng-cd-826629-aa-basefilename-6857135.pdf?src-supplier=Digi-Key, ComponentLink5Description=https://datasheet.ciiva.com/14120/eh826629-draw-14120837.pdf?src-supplier=Distrelec, ComponentLink5URL=https://datasheet.ciiva.com/14120/eh826629-draw-14120837.pdf?src-supplier=Distrelec, Connector Type=Plug,Header,Pin, Contact Gender=Male, Contact Material=Bronze, Contact Mating Length=6.7mm, Contact Plating=Gold,Tin, Contact Post Length=0.1259inch, Contact Protection="No (Without)", Contact Shape=Square, Contact Type="Male Pin", Depth=2.5mm, ELV=Compliant, Gasket="No (Without)", Gender=Male, High Speed Serial Data Connector=No, Housing Color=Green, Housing Material=PBT, Keyed=No, Lead Free="Lead Free", Length=5.08mm, Mating Alignment="No (Without)", Mating Connector Lock="No (Without)", Mount="Straddle Mount", Number of Contacts=2, Number of Positions=2, Number of Rows=1, Orientation=Straight, Packaging=Carton, PCB Mount Retention=Without, PCB Mounting Orientation=Vertical, Pitch=2.54mm, Plating Thickness=0.8um, Radiation Hardening=No, REACH SVHC="No SVHC", RoHS=Yes, Row Spacing=2.54mm, Selectively Loaded="No (Without)", Series="AMPMODU MOD II", Stabilizers="No (Without)", Strain Relief="No (Without)", Supplier 1=RSComponents, Termination="Through Hole"
Q1: "SI2302 Series 20 3 A N-Ch Enhancement Mode Field Effect Transistor - SOT-23-3", Case/Package=SOT-23, Continuous Drain Current (ID)=3A, Drain to Source Breakdown Voltage=20V, Drain to Source Resistance=110mR, Gate to Source Voltage (Vgs)=8V, Input Capacitance=237pF, MANUFACTURER=MCC, Max Operating Temperature=150°C, Max Power Dissipation=1.25W, Min Operating Temperature=-55°C, Package Quantity=3000, Supplier Part Number 1=SI2302-TPMSCT-ND, Category=Transistors, ComponentLink1Description=https://datasheet.ciiva.com/935/si2302sot-23-935107.pdf?src-supplier=Digi-Key, ComponentLink1URL=https://datasheet.ciiva.com/935/si2302sot-23-935107.pdf?src-supplier=Digi-Key, ComponentLink2Description=https://datasheet.ciiva.com/935/si2302sot-23-935109.pdf?src-supplier=Digi-Key, ComponentLink2URL=https://datasheet.ciiva.com/935/si2302sot-23-935109.pdf?src-supplier=Digi-Key, ComponentLink3Description=https://datasheet.ciiva.com/935/si2302sot-23-935108.pdf?src-supplier=Digi-Key, ComponentLink3URL=https://datasheet.ciiva.com/935/si2302sot-23-935108.pdf?src-supplier=Digi-Key, Drain to Source Voltage (Vdss)=20V, Lead Free="Lead Free", Manufacturer Part Number=SI2302-TP, Mount="Surface Mount", Number of Elements=1, Number of Pins=3, Packaging="Tape and Reel", Polarity=N-CHANNEL, Power Dissipation=1.25W, Pricing 1="1=0.50000, 10=0.40300, 100=0.27460, 500=0.20592, 1000=0.15444 (USD)", Rds On Max=72mR, RoHS=Yes, RoHS Compliant=Yes, Stock 1=13753, Supplier 1=Digi-Key
Q4: "Mosfet N-ch 12V 3.2A 3-PIN X2-DFN T/r", Continuous Drain Current (ID)=3.2A, Drain to Source Voltage (Vdss)=12V, Input Capacitance=375pF, MANUFACTURER=Diodes, Max Operating Temperature=150°C, Max Power Dissipation=500mW, Min Operating Temperature=-55°C, Supplier Part Number 1=DMN1045UFR4-7DIDKR-ND, Category=MOSFETs, ComponentLink1Description=http://www.mouser.com/ds/2/115/DMN1045UFR4-526244.pdf?src-supplier=Mouser, ComponentLink1URL=http://www.mouser.com/ds/2/115/DMN1045UFR4-526244.pdf?src-supplier=Mouser, ComponentLink2Description=https://www.diodes.com/assets/Datasheets/DMN1045UFR4.pdf?src-supplier=Digi-Key, ComponentLink2URL=https://www.diodes.com/assets/Datasheets/DMN1045UFR4.pdf?src-supplier=Digi-Key, Manufacturer Part Number=DMN1045UFR4-7, Mount="Surface Mount", Number of Pins=3, Packaging="Tape and Reel", Pricing 1="1=0.50000, 10=0.37400, 100=0.23280, 500=0.15930, 1000=0.12254 (USD)", Rds On Max=45mR, RoHS=Yes, RoHS Compliant=Yes, Supplier 1=Digi-Key
Q5: "2 N-Channel 466pF 10V 5.7nC 10V +150? (Tj) SOT23-6 MOSFETs", MANUFACTURER=TECH, Package=SOT23-6, ComponentLink1Description=LCSC, ComponentLink1URL=https://lcsc.com/product-detail/MOSFETs_TECH-PUBLIC-FS8205A_C2830320.html, Manufacturer Part No=FS8205A
R1 R2 R30 R32 R34: library part RC0603FR-071KL, "RES SMD 1K OHM 1% 1/10W 0603", Case Code (Imperial)=0603, Case Code (Metric)=1608, MANUFACTURER=Yageo, Max Operating Temperature=155°C, Min Operating Temperature=-55°C, Power Rating=100mW, Resistance=1kR, Supplier Part Number 1=311-1.00KHRDKR-ND, Temperature Coefficient=100ppm/°C, Tolerance=1%, Voltage Rating=50V, Case/Package=0603, ComponentLink1Description=https://www.verical.com/server-webapp/html/getDatasheet?partID=409289&src-supplier=Verical, ComponentLink1URL=https://www.verical.com/server-webapp/html/getDatasheet?partID=409289&src-supplier=Verical, ComponentLink2Description=http://documents.rs-components.com/techlib://itc_doclist_GB.htm?stockno=5048928&src-supplier=RSComponents, ComponentLink2URL=http://documents.rs-components.com/techlib://itc_doclist_GB.htm?stockno=5048928&src-supplier=RSComponents, ComponentLink3Description=http://www.yageo.com/documents/recent/PYu-RC0603_51_RoHS_L_4.pdf?src-supplier=Avnet+Europe, ComponentLink3URL=http://www.yageo.com/documents/recent/PYu-RC0603_51_RoHS_L_4.pdf?src-supplier=Avnet+Europe, ComponentLink4Description=http://www.farnell.com/datasheets/2167052.pdf?src-supplier=Element14, ComponentLink4URL=http://www.farnell.com/datasheets/2167052.pdf?src-supplier=Element14, ComponentLink5Description=http://www.farnell.com/datasheets/1868787.pdf?src-supplier=Element14, ComponentLink5URL=http://www.farnell.com/datasheets/1868787.pdf?src-supplier=Element14, ComponentLink6Description=http://www.yageo.com/documents/recent/PYu-RC_Group_51_RoHS_L_2.pdf?src-supplier=Avnet, ComponentLink6URL=http://www.yageo.com/documents/recent/PYu-RC_Group_51_RoHS_L_2.pdf?src-supplier=Avnet, ComponentLink7Description=https://www.verical.com/server-webapp/html/getDatasheet?partID=404327&src-supplier=Verical, ComponentLink7URL=https://www.verical.com/server-webapp/html/getDatasheet?partID=404327&src-supplier=Verical, ComponentLink8Description=http://www.farnell.com/datasheets/443971.pdf?src-supplier=Element14, ComponentLink8URL=http://www.farnell.com/datasheets/443971.pdf?src-supplier=Element14, Composition="Thick Film", Contact Plating=Tin,Matte, Depth=0.8mm, Height=0.45mm, Lead Free="Lead Free", Length=1.6mm, Manufacturer Part Number=RC0603FR-071KL, Military Standard=Not, Packaging="Tape and Reel", Pricing 1="1=0.1, 10=0.023, 100=0.0094, 1000=0.0042, 2500=0.0037 (USD)", Radiation Hardening=No, REACH SVHC="No SVHC", Stock 1=21472395, Supplier 1=Digi-Key, Termination=SMD/SMT
R3 R25 R31 R33 R35 R37: library part RC0603FR-07100KL, "RES SMD 100K OHM 1% 1/10W 0603"
R4: library part WSL0603R0500FEA, "RES 0.05 OHM 1% 1/10W 0603", Case Code (Imperial)=0603, Case Code (Metric)=1608, MANUFACTURER="Vishay Dale", Manufacturer Part Number=WSL0603R0500FEA18, Max Operating Temperature=170°C, Max Power Dissipation=200mW, Min Operating Temperature=-65°C, Package Quantity=1, Resistance=50mR, Resistance Tolerance=1%, Resistor Type="Metal Strip", Supplier Part Number 1=71-WSL0603R0500FEA18, Temperature Coefficient=75ppm/°C, Case/Package=0603, ComponentLink1Description=http://www.vishay.com/docs/31057/wslhigh.pdf?src-supplier=Digi-Key, ComponentLink1URL=http://www.vishay.com/docs/31057/wslhigh.pdf?src-supplier=Digi-Key, ComponentLink2Description=http://www.mouser.com/ds/2/427/wslhigh-101698.pdf?src-supplier=Mouser, ComponentLink2URL=http://www.mouser.com/ds/2/427/wslhigh-101698.pdf?src-supplier=Mouser, Features="Moisture Resistant", Height=0.018inch, Lead Free="Lead Free", Length=0.06inch, Number of Terminations=2, Packaging="Tape and Reel", Power Rating=200mW, Pricing 1="1=0.96, 10=0.717, 50=0.717, 100=0.621, 1000=0.375, 10000=0.326 (USD)", REACH SVHC=Unknown, RoHS Compliant=Yes, Series=WSL-HP, Stock 1=4596, Supplier 1=Mouser, Termination=SMD/SMT, Tolerance=1%, Width=0.03inch
R5: library part RC0603FR-070RL, "RES SMD 0R, 1%, 0.1W, 0603", Case Code (Imperial)=0603, Case Code (Metric)=1608, Current Rating=1A, MANUFACTURER=Yageo, Max Operating Temperature=155°C, Max Power Dissipation=100mW, Min Operating Temperature=-55°C, Package Quantity=5000, Resistance=0mR, Resistor Type="Thick Film", Temperature Coefficient=200ppm/°C, Tolerance=1%, Voltage Rating=50V, Working Voltage=75V, Case/Package=0603, Category="Chip SMD Resistors", ComponentLink1Description=https://datasheet.ciiva.com/11808/0900766b80f96399-11808172.pdf?src-supplier=RSComponents, ComponentLink1URL=https://datasheet.ciiva.com/11808/0900766b80f96399-11808172.pdf?src-supplier=RSComponents, ComponentLink2Description=https://datasheet.ciiva.com/5558/rc0603-272842-5558341.pdf?src-supplier=Mouser, ComponentLink2URL=https://datasheet.ciiva.com/5558/rc0603-272842-5558341.pdf?src-supplier=Mouser, ComponentLink3Description=https://datasheet.ciiva.com/46382/443971-46382072.pdf?src-supplier=Element14, ComponentLink3URL=https://datasheet.ciiva.com/46382/443971-46382072.pdf?src-supplier=Element14, ComponentLink4Description=https://datasheet.ciiva.com/29721/pyu-r-int-thick-7-29721178.pdf?src-supplier=Digi-Key, ComponentLink4URL=https://datasheet.ciiva.com/29721/pyu-r-int-thick-7-29721178.pdf?src-supplier=Digi-Key, ComponentLink5Description=https://datasheet.ciiva.com/5684/443971-5684699.pdf?src-supplier=Farnell, ComponentLink5URL=https://datasheet.ciiva.com/5684/443971-5684699.pdf?src-supplier=Farnell, ComponentLink6Description=https://datasheet.ciiva.com/7983/443971-7983627.pdf?src-supplier=Element14, ComponentLink6URL=https://datasheet.ciiva.com/7983/443971-7983627.pdf?src-supplier=Element14, ComponentLink7Description=https://datasheet.ciiva.com/29721/pyu-rc0603-51-rohs-l-4-29721179.pdf?src-supplier=Digi-Key, ComponentLink7URL=https://datasheet.ciiva.com/29721/pyu-rc0603-51-rohs-l-4-29721179.pdf?src-supplier=Digi-Key, ComponentLink8Description=https://datasheet.ciiva.com/22643/1868787-22643388.pdf?src-supplier=Element14, ComponentLink8URL=https://datasheet.ciiva.com/22643/1868787-22643388.pdf?src-supplier=Element14, Contact Plating=Tin,Matte, Depth=0.8mm, Features="Moisture Resistant", Height=0.45mm, Lead Free="Lead Free", Length=1.6mm, Manufacturer Part Number=RC0603FR-070RL, Military Standard=Not, Number of Pins=2, Number of Terminations=2, Packaging="Tape and Reel", Power Rating=100mW, Pricing 1="5000=0.00320, 5000=0.00490, 50000=0.00450, 500000=0.00250, 2500000=0.00150 (USD)", Radiation Hardening=No, REACH SVHC="No SVHC", RoHS=Yes, Stock 1=1270000, Supplier 1="Arrow Electronics", Supplier Part Number 1=RC0603FR-070RL, Termination=SMD/SMT, Voltage Rating (DC)=50V, Width=0.031inch
R6 R10 R15 R16 R17 R19 R23: library part AC0603JR-0710KL, "RES SMD 10K OHM 5% 1/10W 0603", Case Code (Imperial)=0603, Case Code (Metric)=1608, MANUFACTURER=Yageo, Max Operating Temperature=155°C, Max Power Dissipation=100mW, Min Operating Temperature=-55°C, Package Quantity=1, Resistance=10kR, Resistor Type="Thick Film", Supplier Part Number 1=1029044, Temperature Coefficient=100ppm/°C, Tolerance=5%, Voltage Rating=50V, Case/Package=0603, Category="Chip SMD Resistors", ComponentLink1Description=https://datasheet.ciiva.com/5562/pyu-ac-51-rohs-l-2-5562553.pdf?src-supplier=Mouser, ComponentLink1URL=https://datasheet.ciiva.com/5562/pyu-ac-51-rohs-l-2-5562553.pdf?src-supplier=Mouser, Construction=Rectangular, Depth=0.8mm, Features="Moisture Resistant,Automotive AEC-Q200,Anti-Sulfur", Height=0.022inch, Lead Free="Lead Free", Length=0.063inch, Manufacturer Part Number=AC0603JR-0710KL, Military Standard=Not, Number of Terminations=2, Packaging="Tape and Reel", Power Rating=100mW, Pricing 1="5000=0.00540 (USD)", RoHS=Yes, RoHS Compliant=Yes, Series=AC, Size Code=0603, Stock 1=1533000, Supplier 1="Future Electronics", Termination=SMD/SMT, Width=0.031inch
R7: library part PA2512JKF7W0R001E, "RES 0.001 OHM 5% 2W 2512", MANUFACTURER=YEGEO, Package=2512, ComponentLink1Description="New link", ComponentLink1URL=https://www.digikey.ca/en/products/detail/yageo/PA2512JKF7W0R001E/5913675?s=N4IgTCBcDaIAoEEwFYCMYBSBpAYgdgHUAGAJSKNQFEQBdAXyA, Manufacturer Part No=PA2512JKF7W0R001E
R8: library part ERJ3EKF1202V, "RES SMD 12K OHM 1% 1/10W 0603", Case Code (Imperial)=0603, Case Code (Metric)=1608, MANUFACTURER=Panasonic, Max Operating Temperature=155°C, Max Power Dissipation=100mW, Min Operating Temperature=-55°C, Package Quantity=5000, Resistance=12kR, Resistance Tolerance=1%, Resistor Type="Thick Film", Supplier Part Number 1=1763579, Temperature Coefficient=100ppm/°C, Voltage Rating=75V, Case/Package=0603, Category="Chip SMD Resistors", ComponentLink1Description=https://datasheet.ciiva.com/6138/aoa0000ce2-6138712.pdf?src-supplier=Farnell, ComponentLink1URL=https://datasheet.ciiva.com/6138/aoa0000ce2-6138712.pdf?src-supplier=Farnell, ComponentLink2Description=https://datasheet.ciiva.com/7944/aoa0000ce2-7944617.pdf?src-supplier=Element14, ComponentLink2URL=https://datasheet.ciiva.com/7944/aoa0000ce2-7944617.pdf?src-supplier=Element14, ComponentLink3Description=https://datasheet.ciiva.com/22673/1678782-22673693.pdf?src-supplier=Element14, ComponentLink3URL=https://datasheet.ciiva.com/22673/1678782-22673693.pdf?src-supplier=Element14, ComponentLink4Description=https://datasheet.ciiva.com/22687/1678782-22687413.pdf?src-supplier=Element14, ComponentLink4URL=https://datasheet.ciiva.com/22687/1678782-22687413.pdf?src-supplier=Element14, ComponentLink5Description=https://datasheet.ciiva.com/46420/1678782-46420333.pdf?src-supplier=Element14, ComponentLink5URL=https://datasheet.ciiva.com/46420/1678782-46420333.pdf?src-supplier=Element14, ComponentLink6Description=https://datasheet.ciiva.com/24165/aoa0000ce2-24165037.pdf?src-supplier=Mouser, ComponentLink6URL=https://datasheet.ciiva.com/24165/aoa0000ce2-24165037.pdf?src-supplier=Mouser, ComponentLink7Description=https://datasheet.ciiva.com/16783/70260748-16783400.pdf?src-supplier=Allied+Electronics, ComponentLink7URL=https://datasheet.ciiva.com/16783/70260748-16783400.pdf?src-supplier=Allied+Electronics, ComponentLink8Description=https://datasheet.ciiva.com/30121/aoa0000ce2-30121109.pdf?src-supplier=Onlinecomponents.com, ComponentLink8URL=https://datasheet.ciiva.com/30121/aoa0000ce2-30121109.pdf?src-supplier=Onlinecomponents.com, ComponentLink9Description=https://datasheet.ciiva.com/17211/aoa0000ce2-17211797.pdf?src-supplier=Avnet+Europe, ComponentLink9URL=https://datasheet.ciiva.com/17211/aoa0000ce2-17211797.pdf?src-supplier=Avnet+Europe, ComponentLink10Description=https://datasheet.ciiva.com/16511/aoa0000ce2-16511882.pdf?src-supplier=Avnet+Asia, ComponentLink10URL=https://datasheet.ciiva.com/16511/aoa0000ce2-16511882.pdf?src-supplier=Avnet+Asia, Construction=Rectangular, Contact Plating=Tin, Depth=0.8mm, Features="Automotive AEC-Q200", Height=0.45mm, Lead Free="Lead Free", Length=1.6mm, Manufacturer Part Number=ERJ3EKF1202V, Military Standard=Not, Mount="Surface Mount", Number of Pins=2, Number of Terminations=2, Packaging="Tape and Reel", Power Rating=100mW, Pricing 1="1000=0.00500 (GBP)", Radiation Hardening=No, REACH SVHC="No SVHC", RoHS=Yes, RoHS Compliant=Yes, Series=ERJ, Stock 1=197000, Supplier 1=RSComponents, Termination=SMD/SMT, Tolerance=1%, Voltage Rating (DC)=75V, Weight=7.1E-05oz, Width=0.8mm